# Altium PCB EthereCAT_to_CAN.PcbDoc (part 3 of 3)
Units mil, origin at the board's own origin, x right, y up, seen from the top; angles counter-clockwise.
Board outline 2515.04 x 1574.83 mil, 4 copper layers (Top Layer, L2-G, L3-V, Bottom Layer), stack 23.756 mil thick; 178 components, 102 nets, 583 pads, 389 vias.
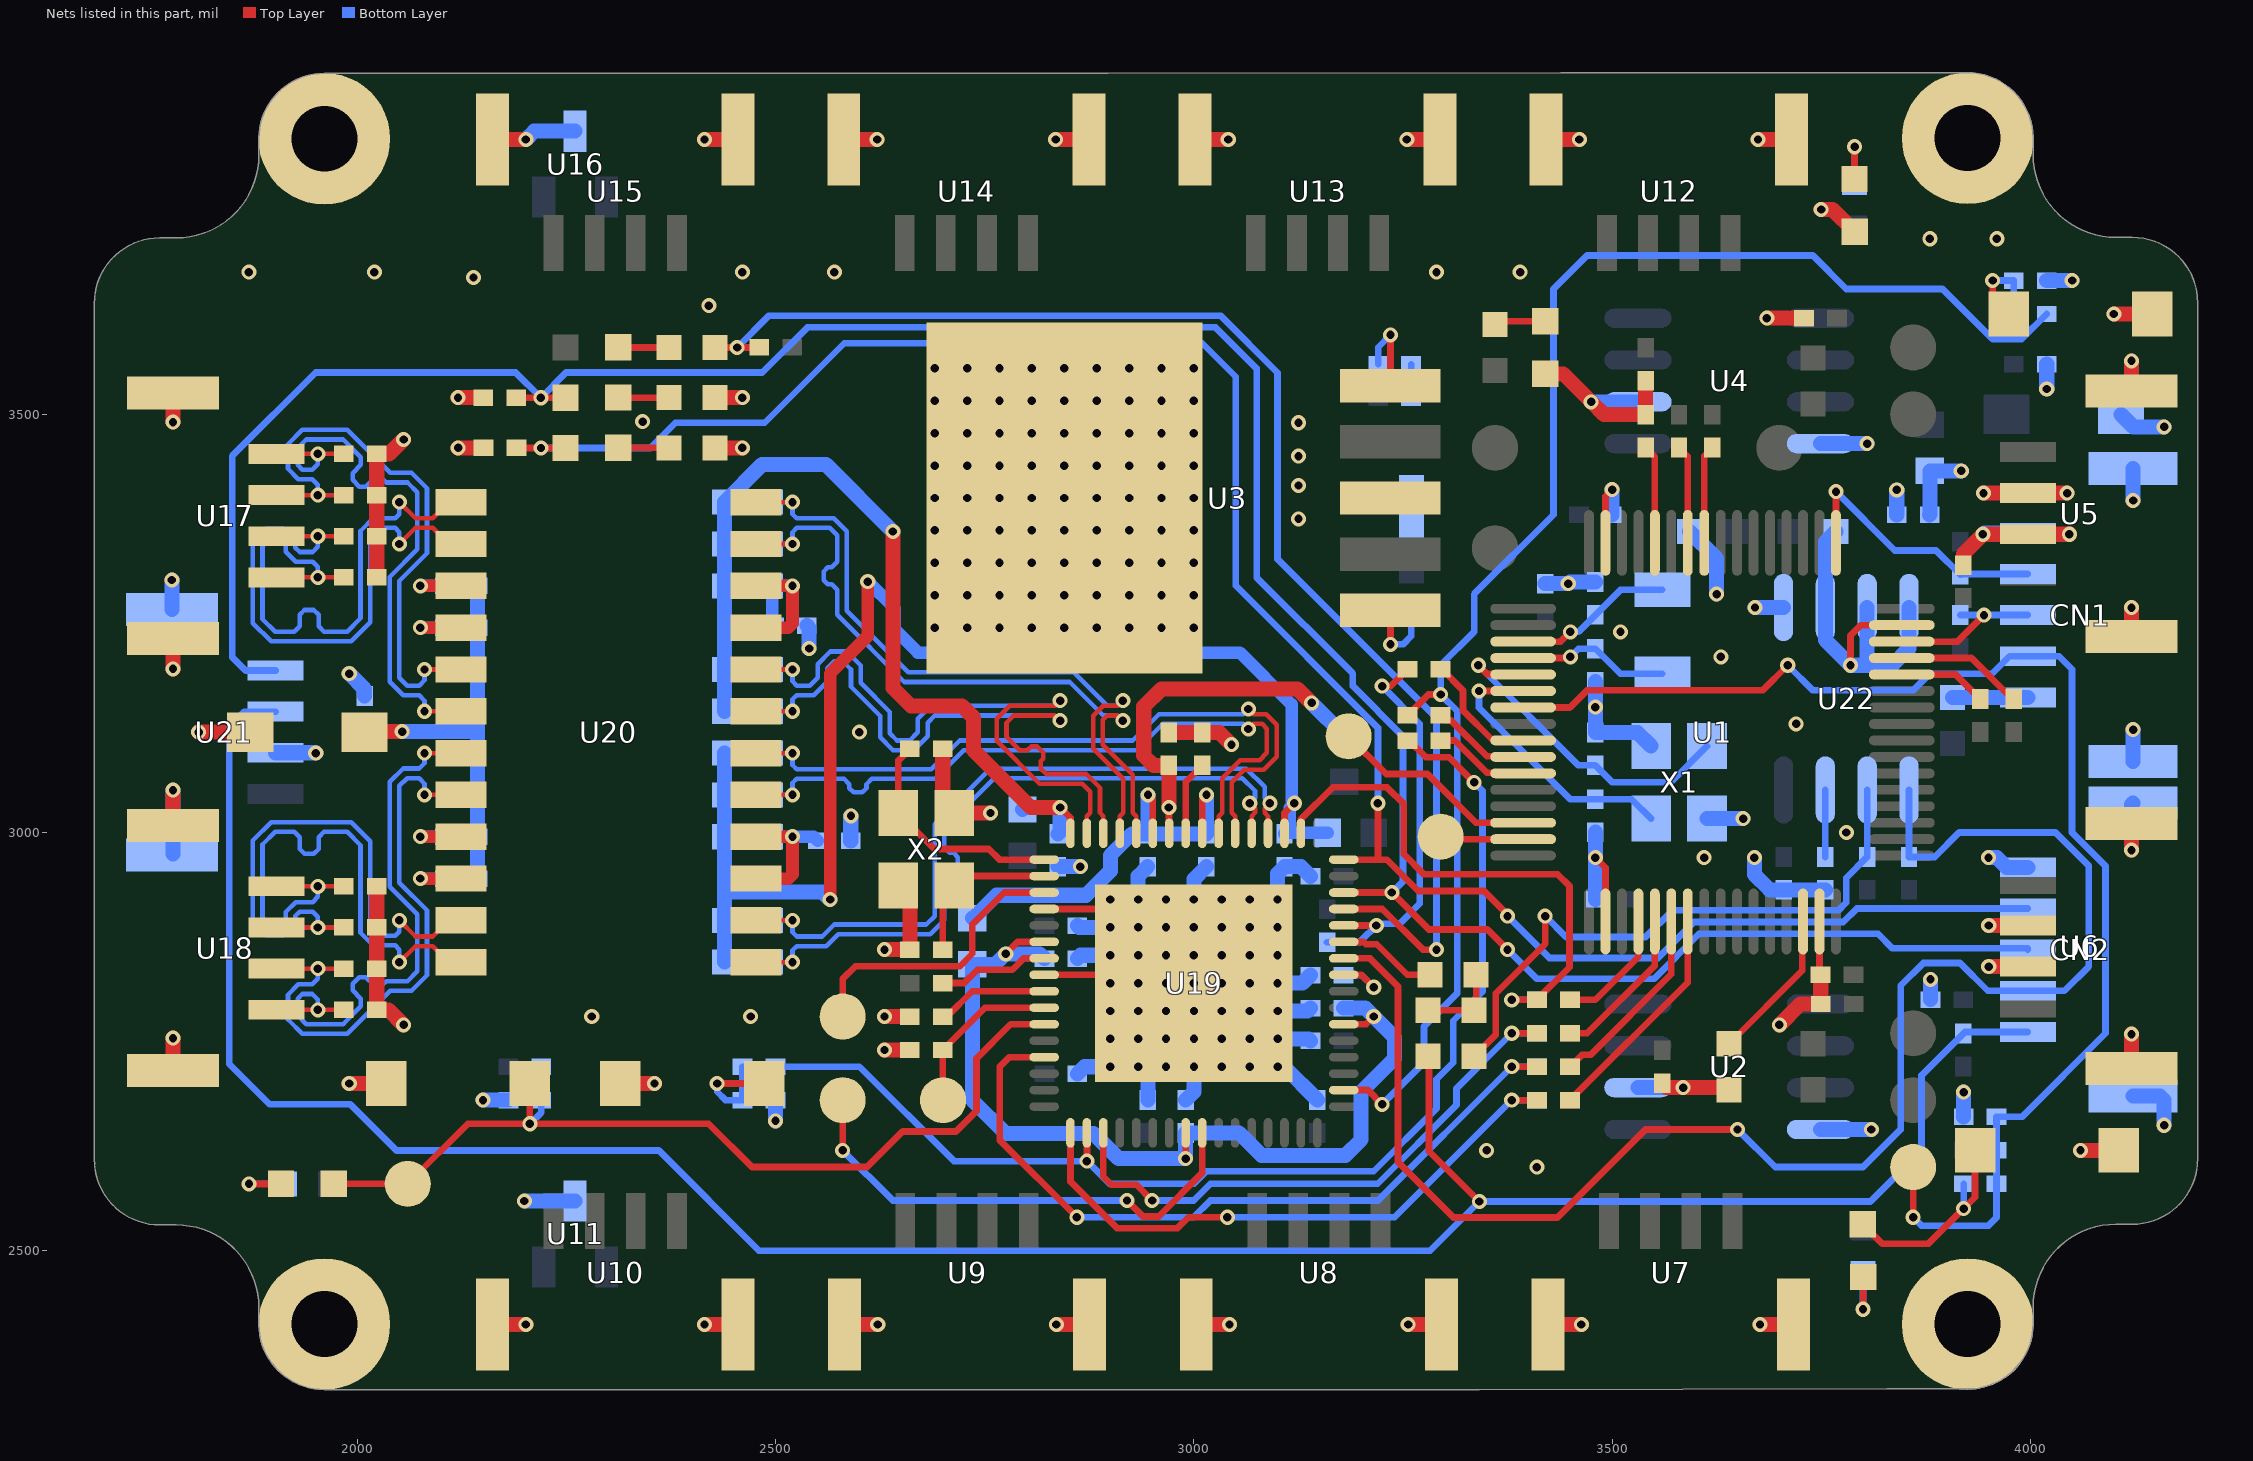
[diagram p4: the nets of this part, all layers, seen from the top]

## Via types
v1: diameter 18, hole 10, Top Layer to Bottom Layer, tented both sides, 389 vias

## Nets (pads, with @x,y where several pads share a name; then routed paths per layer and width w, separated by ;. In a path a pad name is that pad's centre, name@x,y a point inside that pad or via, vN(x,y) a via of type N, cw(c..) or ccw(c..) an arc to the next point about the centre after c; other vN are vias at no path point) (continued)
GND: C1.1 C2.1 C3.1 C4.1 C5.1 C6.1 C7.1 C8.1 C9.1 C10.2 C11.1 C12.1 C13.1 C14.1 C15.1 C16.1 C17.1 C18.1 C19.1 C20.1 C21.1 C24.1 C25.1 C26.1 C27.1 C28.1 C29.1 C30.1 C31.1 C32.1 C33.1 C34.1 C35.1 C36.1 C37.1 C38.1 C39.1 C40.1 C41.1 C42.1 C43.1 C44.1 C45.1 C46.1 C47.1 C48.1 C49.1 C50.1 C51.1 C52.1 C53.1 C54.1 C70.1 CN1.5 CN1.6 CN1.7 CN2.5 CN2.6 CN2.7 D1.1 D2.1 D3.1 D11.1 pad.0 R38.1 R46.1 R47.2 R48.1 R51.2 R52.2 R53.2 R54.2 R61.1 R74.1 SW1.1 SW2.1 SW3.1 SW4.1 U1.18 U1.31 U1.47 U1.63 U2.2 U2.8 U3.3 U3.PAD U4.2 U4.8 U5.2 U5.3 U5.5 U5.6 U6.2 U6.3 U6.5 U6.6 U7.5 U7.6 U8.5 U8.6 U9.5 U9.6 U10.5 U10.6 U11.3 U12.5 U12.6 U13.5 U13.6 U14.5 U14.6 U15.5 U15.6 U16.3 U17.5 U17.6 U18.5 U18.6 U19.4 U19.8 U19.65 U21.2 U21.5 U21.6 U22.1 U22.2 U22.3 U22.4 X1.2 X1.4 X2.2 X2.4 | length 6274
  Top Layer w8: U19.8@2820.87,2829.84 U19.65@2990.14,2829.84 ; U19.4@2820.87,2908.58 2911.4,2908.58 U19.65@2990.14,2829.84 ; v1(3000,2819.98) U19.65@2990.14,2829.84 ; v1(3480,2970) 3492.05,2957.95 U1.18@3492.05,2893.63 ; U1.63@3492.05,3346.37 3492.05,3402.05 v1(3500,3410) ; U1.31@3747.95,2893.63 3747.95,2831.27 C14.1@3749.22,2830 ; v1(3785,3200) 3785,3235.51 3797.44,3247.95 U1.47@3846.37,3247.95
  Top Layer w18: U18.5@1779.22,2715.24 v1(1779.22,2754.22) ; U18.6@1779.22,3008.54 v1(1779.22,3050.78) ; v1(1779.22,3195.78) U17.5@1779.22,3232.24 ; v1(1779.22,3490.78) U17.6@1779.22,3525.54 ; v1(1810,3120) D11.1@1871.69,3120 ; v1(1990,2700) SW4.1@2033.98,2700 ; C31.1@2022.93,2935.71 C29.1@2022.93,2886.5 C30.1@2022.93,2837.29 C32.1@2022.93,2788.07 2036.93,2788.07 v1(2055,2770) ; C36.1@2022.93,3305.07 C35.1@2022.93,3354.29 C34.1@2022.93,3403.5 C33.1@2022.93,3452.71 2037.71,3452.71 v1(2055,3470) ; v1(2120,3520) R53.2@2150.31,3520 ; v1(2120.31,3460) R54.2@2150.63,3460 ; U10.6@2161.41,2411.76 v1(2201.27,2411.76) ; U15.5@2161.41,3828.73 v1(2201.27,3828.73) ; SW3.1@2313.98,2700 v1(2355,2700) ; v1(2414.84,2411.76) U10.5@2454.71,2411.76 ; v1(2414.84,3828.73) U15.6@2454.71,3828.73 ; R52.2@2427.5,3460 v1(2460,3460) ; R51.2@2427.5,3520 v1(2460,3520) ; U14.5@2581.28,3828.73 v1(2621.14,3828.73) ; U9.6@2582.08,2411.76 v1(2621.94,2411.76) ; v1(2630,2740) R48.1@2660.32,2740 ; v1(2630,2780) R38.1@2660.32,2780 ; v1(2630,2860) C49.1@2660.32,2860 2660.32,2922.91 X2.4@2646.53,2936.69 ; C48.1@2699.68,3100 2699.68,3037.09 X2.2@2713.47,3023.31 v1(2756.69,3023.31) ; v1(2834.71,3828.73) U14.6@2874.58,3828.73 ; v1(2835.51,2411.76) U9.5@2875.38,2411.76 ; C40.1@2970,3119.68 R46.1@3010,3119.68 3030.32,3119.68 v1(3045,3105) ; U13.5@3001.14,3828.73 v1(3041.01,3828.73) ; U8.6@3002.74,2411.76 v1(3042.61,2411.76) ; v1(3254.58,3828.73) U13.6@3294.44,3828.73 ; v1(3256.18,2411.76) U8.5@3296.04,2411.76 ; D1.1@3420.14,3548.53 3441.47,3548.53 v1(3475,3515) 3490.32,3499.68 R74.1@3540,3499.68 C8.1@3540,3540.32 ; U12.5@3421.01,3828.73 v1(3460.88,3828.73) ; U7.6@3423.41,2411.76 v1(3463.28,2411.76) ; C3.1@3560,2700.32 3565.31,2695 v1(3585,2695) 3637.5,2695 C18.1@3640,2692.5 ; v1(3674.45,3828.73) U12.6@3714.31,3828.73 ; v1(3676.85,2411.76) U7.5@3716.71,2411.76 ; v1(3685,3615) C9.1@3729.47,3615 ; v1(3700,2770) 3725,2795 C4.1@3749.47,2795 3749.47,2829.75 C14.1@3749.22,2830 ; v1(3750,3745) 3763.66,3745 D3.1@3790.14,3718.53 ; C15.1@3920,3319.68 3920,3333.36 v1(3943.32,3356.68) U5.2@3997.08,3356.68 v1(4046.68,3356.68) ; v1(3944.11,3405.89) U5.3@3997.08,3405.89 v1(4044.11,3405.89) ; v1(3950.32,2839.68) U6.2@3997.08,2839.68 ; v1(3950.32,2888.89) U6.3@3997.08,2888.89 ; v1(4060,2620) SW1.1@4106.02,2620 ; v1(4100,3620) SW2.1@4146.02,3620 ; U6.6@4121.1,2717.64 v1(4121.1,2758.9) ; v1(4121.1,2978.9) U6.5@4121.1,3010.94 ; U5.6@4121.1,3234.64 v1(4121.1,3268.9) ; U5.5@4121.1,3527.94 v1(4121.1,3563.9)
  Bottom Layer w18: U21.5@1777.99,3266.65 v1(1777.99,3302.01) ; U21.6@1779.22,2974.58 v1(1779.22,3050.78) ; U21.2@1902.01,3095.39 1949.61,3095.39 v1(1950,3095) ; v1(1990,3190) 2008.31,3171.69 C70.1@2008.31,3163.31 ; v1(2150,2680) C27.1@2180.32,2680 ; v1(2199.37,2559.37) U11.3@2260,2559.37 ; v1(2201.27,3828.73) 2211.14,3838.59 U16.3@2260.01,3838.59 ; v1(2499.68,2655.32) C26.1@2499.68,2680 ; C37.1@2537.18,3247.5 2540,3244.69 v1(2540,3220) ; C28.1@2589.68,2990 2589.68,3019.68 v1(2590,3020) ; C38.1@2837.37,2959.14 v1(2864.14,2959.14) ; C46.1@2860.56,2711.42 2869.1,2719.97 v1(2900.02,2719.97) ; C50.1@2860.56,2849.22 2864.64,2853.3 v1(2899.99,2853.3) ; C43.1@2860.56,2888.59 2862.51,2886.64 v1(2899.99,2886.64) ; v1(2933.32,2919.97) 2933.32,2947.84 C54.1@2944.62,2959.14 ; v1(2933.35,2719.97) 2945,2708.32 C45.1@2945,2680.24 ; C52.1@2990.17,2680.24 3000.02,2690.08 v1(3000.02,2719.99) ; v1(2999.98,2919.98) 2999.98,2944.27 C53.1@3014.85,2959.14 ; v1(3100.01,2720) 3107.88,2720 C44.1@3147.65,2680.24 ; v1(3100.01,2753.33) 3136.9,2753.33 C42.1@3139.45,2750.79 ; v1(3100.01,2786.67) 3135.95,2786.67 C51.1@3139.45,2790.16 ; v1(3100,2820) 3129.91,2820 R47.2@3139.45,2829.53 ; v1(3099.98,2920) 3099.98,2950.84 C41.1@3108.28,2959.14 3127.95,2959.14 C39.1@3139.45,2947.64 ; C16.1@3420,3297.56 v1(3447.56,3297.56) 3449.68,3299.68 C2.1@3480,3299.68 ; v1(3475,3515) U4.2@3530.85,3515 ; C10.2@3480,3000.31 v1(3480,2970) 3480,2920.32 C17.1@3480.32,2920 ; C1.1@3480,3180.32 v1(3480,3150) C7.1@3480,3119.68 3530.16,3119.68 X1.2@3546.53,3103.31 ; C19.1@3499.68,3380 3500,3380.32 v1(3500,3410) ; U2.2@3530.85,2695 v1(3585,2695) ; C21.1@3592.5,3360 3625,3327.5 v1(3625,3285) ; X1.4@3613.47,3016.69 v1(3656.69,3016.69) ; v1(3670,2970) 3670,2950 3688.52,2931.48 C47.1@3705,2931.48 R61.1@3755,2931.48 ; v1(3670.85,3269.15) U22.1@3705,3269.15 ; U2.8@3749.15,2645 v1(3810,2645) ; U4.8@3749.15,3465 v1(3805,3465) ; C20.1@3767.5,3360 3755,3347.5 U22.2@3755,3269.15 3755,3230 v1(3785,3200) 3810,3200 ; U22.3@3805,3269.15 3805,3205 3810,3200 ; C11.1@3840.32,3380 v1(3840.32,3409.68) ; U22.4@3855,3269.15 3855,3220 3835,3200 3810,3200 ; C13.1@3880.63,2800.31 v1(3880.63,2824.37) ; C24.1@3920.32,2660 v1(3920.32,2689.68) ; v1(3943.32,3356.68) 3945.04,3358.4 CN1.5@3997.01,3358.4 ; v1(3950,2970) 3960,2970 3971.6,2958.4 CN2.5@3997.01,2958.4 ; v1(4019.68,3530.32) C12.1@4019.68,3560 ; C25.1@4019.68,3660 v1(4050,3660) ; D2.1@4108.31,3500 4123.31,3485 v1(4160,3485) ; v1(4121.1,2978.9) 4121.1,3033.3 CN2.7@4122.99,3035.2 ; CN2.6@4122.99,2684.8 4155.2,2684.8 4160,2680 v1(4160,2650) ; CN1.6@4122.99,3084.8 v1(4122.99,3122.99) ; v1(4122.99,3397.01) CN1.7@4122.99,3435.2
  other v1: 3410,2600 3350,2620 2966.68,2719.97 3033.35,2720 3066.68,2720 2900.02,2753.3 2933.35,2753.3 2966.68,2753.3 3000.02,2753.32 3033.35,2753.33 3066.68,2753.33 2280,2780 2470,2780 2900.02,2786.64 2933.35,2786.64 2966.68,2786.64 3000.02,2786.65 3033.35,2786.67 3066.68,2786.67 2900,2819.97 2933.33,2819.97 2966.67,2819.97 3033.33,2820 3066.67,2820 2933.32,2853.3 2966.65,2853.3 2999.98,2853.32 3033.32,2853.33 3066.65,2853.33 3099.98,2853.33 2933.32,2886.64 2966.65,2886.64 2999.98,2886.65 3033.32,2886.67 3066.65,2886.67 3099.98,2886.67 2899.99,2919.97 2966.65,2919.97 3033.32,2920 3066.65,2920 3610,2970 3780,3000 2600,3120 3720,3130 3630,3210 3510,3240 2690.04,3245.02 2728.79,3245.02 2767.53,3245.02 2806.28,3245.02 2845.02,3245.02 2883.76,3245.02 2922.51,3245.02 2961.25,3245.02 3000,3245.02 2690.04,3283.77 2728.79,3283.77 2767.53,3283.77 2806.28,3283.77 2845.02,3283.77 2883.76,3283.77 2922.51,3283.77 2961.25,3283.77 3000,3283.77 2690.04,3322.51 2728.79,3322.51 2767.53,3322.51 2806.28,3322.51 2845.02,3322.51 2883.76,3322.51 2922.51,3322.51 2961.25,3322.51 3000,3322.51 2690.04,3361.26 2728.79,3361.26 2767.53,3361.26 2806.28,3361.26 2845.02,3361.26 2883.76,3361.26 2922.51,3361.26 2961.25,3361.26 3000,3361.26 3125,3375 2690.04,3400 2728.79,3400 2767.53,3400 2806.28,3400 2845.02,3400 2883.76,3400 2922.51,3400 2961.25,3400 3000,3400 3125,3415 2690.04,3438.74 2728.79,3438.74 2767.53,3438.74 2806.28,3438.74 2845.02,3438.74 2883.76,3438.74 2922.51,3438.74 2961.25,3438.74 3000,3438.74 3125,3450 2690.04,3477.49 2728.79,3477.49 2767.53,3477.49 2806.28,3477.49 2845.02,3477.49 2883.76,3477.49 2922.51,3477.49 2961.25,3477.49 3000,3477.49 3125,3490 2340.75,3491.25 2690.04,3516.23 2728.79,3516.23 2767.53,3516.23 2806.28,3516.23 2845.02,3516.23 2883.76,3516.23 2922.51,3516.23 2961.25,3516.23 3000,3516.23 2690.04,3554.98 2728.79,3554.98 2767.53,3554.98 2806.28,3554.98 2845.02,3554.98 2883.76,3554.98 2922.51,3554.98 2961.25,3554.98 3000,3554.98 2420,3630 2138.62,3663.58 1870,3670 2020,3670 2460,3670 2570,3670 3290,3670 3390,3670 3880,3710 3960,3710
LINK0: CN2.4 D8.2 R54.1 U19.48 | length 2497.7
  Top Layer w8: R54.1@2190,3460 2190.14,3459.86 v1(2219.33,3459.86) D8.2@2248.53,3459.86 ; U19.48@3179.13,2967.64 3230.54,2967.64 3268.19,2930 3347.02,2930 3375,2902.02 v1(3375,2900) ; 3220,2967.64 v1(3220,3035)
  Bottom Layer w8: v1(2219.33,3459.86) 2349.86,3459.86 2380,3490 2486.87,3490 2581.87,3585 3010,3585 3050,3545 3050,3295.2 3220,3125.2 v1(3220,3035) ; v1(3375,2900) 3425,2850 3555,2850 3598,2893 3776.43,2893 3792.63,2909.2 CN2.4@3997.01,2909.2
LINK1: CN2.3 D7.2 R53.1 U19.46 U21.4 | length 3288.1
  Top Layer w8: R53.1@2189.68,3520 2189.82,3519.86 v1(2219.17,3519.86) D7.2@2248.52,3519.86 ; U19.46@3179.13,2928.27 v1(3236.73,2928.27) 3280.86,2884.14 3350.86,2884.14 v1(3375,2860)
  Bottom Layer w8: U21.4@1902.01,3193.82 1866.18,3193.82 1850,3210 1850,3450 1950,3550 2189.03,3550 v1(2219.17,3519.86) 2249.3,3550 2483.9,3550 2537.9,3604 3026,3604 3075,3555 3075,3305 3190,3190 3190,3175 3250,3115 3250,2941.55 v1(3236.73,2928.27) ; v1(3375,2860) 3410,2825 3550,2825 3604,2879 3817.87,2879 3835.37,2861.5 3997.01,2861.5 CN2.3@3997.01,2860
NetC18_2: C18.2 U1.30 | length 182.7
  Top Layer w8: C18.2@3640,2747.5 3727.41,2834.91 3727.41,2892.77 U1.30@3728.27,2893.63
NetC25_2: C25.2 R30.2 SW2.2 | length 113.2
  Top Layer w8: v1(3955,3660) 3955,3638.98 SW2.2@3973.98,3620
  Bottom Layer w8: v1(3955,3660) C25.2@3980.31,3660 R30.2@3980.31,3620
NetC26_2: C26.2 R37.2 SW3.2 | length 140.5
  Top Layer w8: v1(2430,2700) SW3.2@2486.02,2700
  Bottom Layer w8: v1(2430,2700) 2430,2690 2440,2680 C26.2@2460.31,2680 R37.2@2460.31,2720
NetC70_2: C70.2 D11.2 R80.1 R90.1 R91.1 R92.1 | length 531.8
  Top Layer w18: D11.2@2008.31,3120 2008.9,3120.59 v1(2053.28,3120.59)
  Bottom Layer w18: C70.2@2008.31,3123.94 2011.65,3120.59 v1(2053.28,3120.59) 2143.5,3120.59 ; R92.1@2143.5,2945 R91.1@2143.5,2995 2143.5,3120.59 ; R90.1@2143.5,3295 R80.1@2143.5,3245 2143.5,3120.59
NetD1_2: D1.2 R2.1 | length 61.5
  Top Layer w8: R2.1@3360,3607.5 3363.98,3611.47 D1.2@3419.86,3611.47
NetD3_2: D3.2 R21.2 | length 70.9
  Top Layer w8: D3.2@3789.86,3781.47 3789.86,3809.86
  Bottom Layer w8: R21.2@3790,3777.5 v1(3790,3820)
NetD4_1: D4.1 R24.2 SW1.2 | length 252.3
  Top Layer w8: D4.1@3799.86,2531.48 3822.85,2508.5 3878.5,2508.5 v1(3920.31,2550.31) 3933.98,2563.98 SW1.2@3933.98,2620
  Bottom Layer w8: v1(3920.31,2550.31) R24.2@3920.31,2580
NetD4_2: D4.2 R22.2 | length 81.1
  Top Layer w8: v1(3800,2430) 3800.14,2430.14 D4.2@3800.14,2468.52
  Bottom Layer w8: v1(3800,2430) R22.2@3800,2472.5
NetD5_2: D5.2 R29.2 | length 80.8
  Top Layer w8: v1(1870.13,2579.86) D5.2@1908.52,2579.86
  Bottom Layer w8: v1(1870.13,2579.86) 1870.27,2580 R29.2@1912.5,2580
NetD6_1: D6.1 R50.1 | length 61.1
  Top Layer w8: D6.1@2311.47,3580.14 2311.61,3580 R50.1@2372.5,3580
NetD7_1: D7.1 R51.1 | length 61.1
  Top Layer w8: D7.1@2311.48,3520.14 2311.61,3520 R51.1@2372.5,3520
NetD8_1: D8.1 R52.1 | length 61.1
  Top Layer w8: D8.1@2311.47,3460.14 2311.61,3460 R52.1@2372.5,3460
NetR3_1: R3.1 U3.1 | length 95
  Top Layer w8: v1(3234.98,3225.02) U3.1@3234.98,3266
  Bottom Layer w8: v1(3234.98,3225.02) 3250.02,3225.02 3259.68,3234.68 R3.1@3259.68,3260
NetR4_2: R4.2 R7.1 | length 40
  Bottom Layer w8: R4.2@3259.69,3520 R7.1@3259.68,3560
NetR7_2: R7.2 U3.5 | length 102
  Top Layer w8: U3.5@3234.98,3534 v1(3234.98,3594.98)
  Bottom Layer w8: R7.2@3220.31,3560 3220.31,3580.31 v1(3234.98,3594.98)
NetR19_2: R19.2 U1.45 | length 153.9
  Top Layer w8: U1.45@3846.37,3208.58 3929.55,3208.58 3978.44,3159.69 R19.2@3980,3159.69
NetR20_2: R20.2 U1.44 | length 105.7
  Top Layer w8: U1.44@3846.37,3188.9 3910.79,3188.9 R20.2@3940,3159.69
NetR38_2: R38.2 U19.9 | length 133.7
  Top Layer w8: R38.2@2699.69,2780 2704.8,2780 2734.96,2810.16 U19.9@2820.87,2810.16
NetR46_2: R46.2 U19.57 | length 89.4
  Top Layer w8: U19.57@2990.17,2999.13 2990.17,3060.48 R46.2@3010,3080.31
NetR47_1: R47.1 U19.41 | length 84.2
  Top Layer w8: U19.41@3179.13,2829.84 3200.16,2829.84 v1(3215,2815)
  Bottom Layer w8: R47.1@3178.82,2829.53 3200.47,2829.53 v1(3215,2815)
NetR48_2: R48.2 TP13.1 U19.10 | length 202.2
  Top Layer w8: TP13.1@2700,2680 2699.69,2680.31 R48.2@2699.69,2740 2750.16,2790.47 U19.10@2820.87,2790.47
NetR56_2: R56.2 R57.1 R60.1 | length 98.5
  Top Layer w8: R56.2@3280,2787.5 R60.1@3335,2787.5 3337.5,2789.99 R57.1@3337.5,2830
NetR57_2: R57.2 U19.43 | length 119.6
  Top Layer w8: U19.43@3179.13,2869.21 3203.04,2869.21 3205.82,2866.44 3218.56,2866.44 3255,2830 R57.2@3282.5,2830
NetR61_2: R61.2 U22.7 | length 80
  Bottom Layer w8: R61.2@3755,2970.85 U22.7@3755,3050.85
NetR70_2: R70.2 U1.58 | length 118.3
  Top Layer w8: R70.2@3580,3460.31 3590.47,3449.84 U1.58@3590.47,3346.37
NetR71_2: R71.2 U1.57 | length 118
  Top Layer w8: U1.57@3610.16,3346.37 3610.16,3450.47 R71.2@3620,3460.31
NetR74_2: R74.2 U1.60 | length 118.5
  Top Layer w8: R74.2@3540,3460.31 3551.1,3449.21 U1.60@3551.1,3346.37
NetR75_1: R75.1 U1.21 | length 187.5
  Top Layer w8: R75.1@3449.68,2760 3470,2760 3551.1,2841.1 U1.21@3551.1,2893.63
NetR76_1: R76.1 U1.22 | length 229.8
  Top Layer w8: R76.1@3449.68,2720 3463.89,2734.2 3474.2,2734.2 3570.79,2830.79 U1.22@3570.79,2893.63
NetR77_1: R77.1 U1.23 | length 271.9
  Top Layer w8: R77.1@3449.68,2680 3590.47,2820.78 U1.23@3590.47,2893.63
NetR78_1: R78.1 U1.20 | length 145.2
  Top Layer w8: R78.1@3449.68,2800 3480,2800 3531.42,2851.42 U1.20@3531.42,2893.63
NetTP12_1: TP12.1 U19.25 | length 592
  Top Layer w8: v1(2580,2620) TP12.1@2580,2680 ; v1(2920,2560) 2939,2541 2957.87,2541 3009.85,2592.98 U19.25@3009.85,2640.86
  Bottom Layer w8: v1(2580,2620) 2640,2560 v1(2920,2560)
NetTP14_1: TP14.1 U19.3 | length 349.2
  Top Layer w8: TP14.1@2580,2780 2580,2825 2595,2840 2720,2840 2735,2855 2735,2890 2773.27,2928.27 U19.3@2820.87,2928.27
PC1: R79.1 U1.9 | length 147.6
  Top Layer w8: R79.1@3295.68,3195.98 3321.79,3169.86 3321.79,3145.72 3356.62,3110.89 3392.9,3110.89 U1.9@3393.63,3110.16
PC2: R72.1 U1.10 | length 119.5
  Top Layer w8: R72.1@3294.68,3140 3300.53,3134.16 3307.51,3134.16 3350.47,3091.2 3392.9,3091.2 U1.10@3393.63,3090.47
PC3: R73.1 U1.11 | length 116.5
  Top Layer w8: R73.1@3293.34,3110 3311.87,3110 3350.35,3071.52 3392.9,3071.52 U1.11@3393.63,3070.79
PHY_IRQn: R39.2 R79.2 U19.44 | length 486.1
  Top Layer w8: U19.44@3179.13,2888.9 v1(3218.05,2888.9) ; v1(3225,3175) 3235.31,3175 R79.2@3255.31,3195
  Bottom Layer w8: R39.2@3159.13,2868.9 3198.05,2868.9 3219.96,2890.82 3245.82,2890.82 3270,2915 3270,3130 v1(3225,3175)
REG_EN: R40.2 U19.7 | length 133.4
  Top Layer w8: R40.2@2699.69,2820 2725,2820 2741,2836 2782.87,2836 2796.4,2849.53 U19.7@2820.87,2849.53
RST2n: C24.2 CN1.2 R23.2 R24.1 TP9.1 U1.7 | length 1624.8
  Top Layer w8: U1.7@3393.63,3149.53 3449.53,3149.53 3470,3170 3680,3170 v1(3710,3200) ; v1(3860,2540) TP9.1@3860,2600
  Bottom Layer w8: v1(3710,3200) 3740,3170 3860,3170 3880,3190 3954.55,3190 3975.35,3210.8 4034.47,3210.8 4050,3195.27 4050,3000 4090,2960 4090,2760 3990,2660 C24.2@3959.69,2660 R24.1@3959.68,2580 3959.68,2539.68 3950,2530 3870,2530 v1(3860,2540)
RSTn: C27.2 D5.1 R36.2 SW4.2 TP11.1 U19.11 | length 1130.4
  Top Layer w8: D5.1@1971.48,2580.14 2059.86,2580.14 TP11.1@2060,2580 2131.81,2651.81 v1(2206.02,2651.81) ; SW4.2@2206.02,2700 v1(2206.02,2651.81) ; U19.11@2820.87,2770.79 2780.79,2770.79 2740,2730 2740,2666.88 2715.56,2642.44 2651.76,2642.44 2609.31,2600 2471.62,2600 2419.8,2651.81 v1(2206.02,2651.81)
  Bottom Layer w8: v1(2206.02,2651.81) 2219.69,2665.48 C27.2@2219.69,2680 R36.2@2219.69,2720
RUN_E2PS: R49.2 R50.2 U19.45 | length 1642.4
  Top Layer w8: R50.2@2427.5,3580 v1(2453.91,3580) R49.2@2480.31,3580 ; U19.45@3179.13,2908.58 3225.24,2908.58 3273.82,2860 v1(3290,2860)
  Bottom Layer w8: v1(2453.91,3580) 2491.91,3618 3031.8,3618 3100,3549.8 3100,3326.87 3290,3136.87 v1(3290,2860)
RXA+: C30.2 U18.3 U20.20 | length 701.3
  Top Layer w5.5: U18.3@1903.24,2837.29 v1(1952.48,2837.29) C30.2@1983.56,2837.29 ; v1(2080,3045) U20.20@2123.82,3045
  Bottom Layer w5.5: v1(1952.48,2837.29) 1952.48,2825.03 1945.87,2818.43 1929.24,2818.43 1916.79,2805.98 1916.79,2776.45 1933.96,2759.28 1987.41,2759.28 2038.91,2810.78 2064.48,2810.78 2083,2829.3 2083,2907.02 2050,2940.02 2050,3055.79 2059.24,3065.03 2073.52,3065.03 2080,3058.55 v1@2080,3045.78
RXA-: C32.2 U18.4 U20.19 | length 701.3
  Top Layer w5.5: U18.4@1903.24,2788.07 v1(1952.48,2788.07) C32.2@1983.56,2788.07 ; v1(2080,3095) U20.19@2123.82,3095
  Bottom Layer w5.5: v1(1952.48,2788.07) 1952.48,2800.32 1945.87,2806.93 1934.01,2806.93 1928.29,2801.21 1928.29,2781.21 1938.72,2770.78 1982.65,2770.78 1986.16,2774.29 2004.01,2792.15 2004.01,2801.26 1994.07,2811.2 1994.07,2819.15 2002.03,2827.11 2009.98,2827.11 2019.92,2817.17 2029.04,2817.17 2034.15,2822.28 2035.78,2822.28 2059.71,2822.28 2071.5,2834.07 2071.5,2902.26 2038.5,2935.26 2038.5,3060.56 2054.48,3076.53 2073.52,3076.53 2080,3083.01 v1(2080,3095) v1@2080,3095.78
RXA_N: R35.2 U19.54 U20.6 | length 868.2
  Top Layer w5.5: U20.6@2476.18,3095 v1(2520,3095) ; U19.54@3049.22,2999.13 3049.22,3019.6 3045.13,3023.69 3045.13,3060.13 3060,3075 3083.39,3075 3098.81,3090.41 3098.81,3129.08 3086.38,3141.5 3071.25,3141.5 v1(3065,3147.75)
  Bottom Layer w5.5: R35.2@2495.87,3095 v1(2520,3095) 2520,3080.75 2525,3075.75 2685.75,3075.75 2720,3110 2926.76,3110 2958.26,3141.5 3058.75,3141.5 v1(3065,3147.75)
RXA_P: R34.2 U19.55 U20.5 | length 868.2
  Top Layer w5.5: U20.5@2476.18,3045 v1(2520,3045) ; U19.55@3029.54,2999.13 3029.54,3019.6 3033.63,3023.69 3033.63,3064.89 3055.24,3086.5 3078.63,3086.5 3087.31,3095.18 3087.31,3124.31 3081.62,3130 3071.25,3130 v1(3065,3123.75)
  Bottom Layer w5.5: R34.2@2495.87,3045 v1(2520,3045) 2520,3059.25 2525,3064.25 2558.33,3064.25 2581.58,3064.25 2588.02,3057.81 2588.02,3053.07 2593.14,3047.95 2603.39,3047.95 2608.52,3053.07 2608.52,3057.81 2614.96,3064.25 2630,3064.25 2690.51,3064.25 2724.76,3098.5 2931.52,3098.5 2963.02,3130 3058.75,3130 v1(3065,3123.75)
RXB+: C35.2 U17.3 U20.14 | length 701.1
  Top Layer w5.5: U17.3@1903.24,3354.29 v1(1952.48,3354.29) C35.2@1983.56,3354.29 ; v1(2050,3345) 2069.25,3364.25 2089.8,3364.25 2109.05,3345 U20.14@2123.82,3345
  Bottom Layer w5.5: v1(1952.48,3354.29) 1952.48,3341.68 1946.23,3335.43 1930.75,3335.43 1925.65,3340.54 1925.65,3348.8 1911.08,3363.36 1890.86,3363.36 1874.75,3347.25 1874.75,3250.31 1896.56,3228.5 1992.24,3228.5 2015,3251.26 2015,3355.78 2023.47,3364.25 2045,3364.25 2050,3359.25 v1(2050,3345)
RXB-: C36.2 U17.4 U20.13 | length 701.1
  Top Layer w5.5: U17.4@1903.24,3305.07 v1(1952.48,3305.07) C36.2@1983.56,3305.07 ; v1(2050,3395) 2069.25,3375.75 2089.8,3375.75 2109.05,3395 U20.13@2123.82,3395
  Bottom Layer w5.5: v1(1952.48,3305.07) 1952.48,3317.69 1946.23,3323.93 1925.99,3323.93 1914.15,3335.77 1914.15,3344.03 1906.32,3351.86 1895.63,3351.86 1886.25,3342.49 1886.25,3255.07 1901.33,3240 1906.96,3240 1924.44,3240 1930.89,3246.44 1930.89,3260.5 1936.51,3266.12 1947.76,3266.12 1953.39,3260.5 1953.39,3246.44 1959.83,3240 1985.08,3240 1987.48,3240 2003.5,3256.02 2003.5,3360.55 2018.7,3375.75 2045,3375.75 2050,3380.75 v1(2050,3395)
RXB_N: R45.2 U19.61 U20.12 | length 830.5
  Top Layer w5.5: U20.12@2476.18,3395 v1(2520,3395) ; U19.61@2911.43,2999.13 2911.43,3019.6 2915.52,3023.69 2915.52,3064.48 2879.67,3100.33 2879.67,3139.67 2891.5,3151.5 2908.75,3151.5 v1(2915,3157.75)
  Bottom Layer w5.5: R45.2@2495.87,3395 v1(2520,3395) 2520,3380.75 2525,3375.75 2569.53,3375.75 2585,3360.28 2585,3265 2658.5,3191.5 2856.12,3191.5 2896.12,3151.5 2908.75,3151.5 v1(2915,3157.75)
RXB_P: R44.2 U19.60 U20.11 | length 830.5
  Top Layer w5.5: U20.11@2476.18,3345 v1(2520,3345) ; v1(2915,3133.75) 2908.75,3140 2896.26,3140 2891.17,3134.91 2891.17,3105.09 2927.02,3069.24 2927.02,3023.69 2931.11,3019.6 U19.60@2931.11,2999.13
  Bottom Layer w5.5: R44.2@2495.87,3345 v1(2520,3345) 2520,3359.25 2525,3364.25 2564.77,3364.25 2573.5,3355.52 2573.5,3346.88 2573.5,3323.63 2567.06,3317.19 2562.32,3317.19 2557.2,3312.06 2557.2,3301.81 2562.32,3296.69 2567.06,3296.69 2573.5,3290.24 2573.5,3275.38 2573.5,3260.24 2653.74,3180 2851.36,3180 2891.36,3140 2908.75,3140 v1(2915,3133.75)
SCL: R58.1 R60.2 U22.6 | length 735
  Top Layer w8: R60.2@3335,2732.5 3361,2758.49 3361,2807.87 3420,2866.87 v1(3420,2900)
  Bottom Layer w8: v1(3420,2900) 3445,2875 3540,2875 3572,2907 3770.63,2907 3780,2916.37 3780,2945.85 R58.1@3805,2970.85 U22.6@3805,3050.85
SDA: CN2.2 R59.1 U19.42 U22.5 | length 1875.8
  Top Layer w8: U19.42@3179.13,2849.53 3210.47,2849.53 3244,2816 3244,2606 3310.21,2539.79 3434.79,2539.79 3540,2645 v1(3650,2645)
  Bottom Layer w8: v1(3650,2645) 3695,2600 3800,2600 3845,2645 3845,2816.87 3872.13,2844 3916,2844 3949.2,2810.8 CN2.2@3997.01,2810.8 4040.8,2810.8 4070,2840 4070,2960.2 4030.2,3000 3915,3000 3885.85,2970.85 R59.1@3855,2970.85 U22.5@3855,3050.85
SPI_CLK: R17.2 R75.2 U19.19 | length 707.6
  Top Layer w8: U19.19@2891.74,2640.86 2891.74,2588.37 2901.11,2579 2931,2579 v1(2950,2560) ; v1(3380,2760) R75.2@3410.31,2760
  Bottom Layer w8: v1(2950,2560) 2999.8,2560 3019.8,2580 3219.8,2580 3314,2674.2 3314,2694 v1(3380,2760) R17.2@3410.31,2760
SPI_CSn: R16.2 R78.2 U19.50 | length 650.4
  Top Layer w8: U19.50@3127.96,2999.13 3127.96,3016.09 3165.92,3054.05 3230.95,3054.05 3250.95,3034.05 3250.95,2974.05 3275,2950 3435,2950 3449,2936 3449,2839 3410.31,2800.31 R78.2@3410.31,2800 v1(3380,2800)
  Bottom Layer w8: v1(3380,2800) R16.2@3410.31,2800
SPI_SI: R15.2 R77.2 U19.17 | length 732.9
  Top Layer w8: U19.17@2852.37,2640.86 2852.37,2582.63 2908,2527 2980.31,2527 2993.31,2540 v1(3040,2540) ; v1(3380,2680) R77.2@3410.31,2680
  Bottom Layer w8: v1(3040,2540) 3240,2540 v1(3380,2680) R15.2@3410.31,2680
SPI_SO: R14.2 R76.2 U19.13 | length 931
  Top Layer w8: U19.13@2820.87,2731.42 2779.56,2731.42 2767.74,2719.6 2767.74,2632.26 v1(2860,2540) ; v1(3380,2720) R76.2@3410.31,2720
  Bottom Layer w8: v1(2860,2540) 2999.6,2540 3019.6,2560 3220,2560 v1(3380,2720) R14.2@3410.31,2720
SWDCLK: CN1.4 R28.2 U1.49 | length 332.2
  Top Layer w8: U1.49@3767.64,3346.37 v1(3767.64,3407.64)
  Bottom Layer w8: v1(3767.64,3407.64) 3837.94,3337.34 3887.34,3337.34 R28.2@3916.49,3308.19 3917.5,3309.2 CN1.4@3997.01,3309.2
SWDIO: CN1.3 R26.2 U1.46 | length 192
  Top Layer w8: U1.46@3846.37,3228.27 3912.99,3228.27 v1(3944.72,3260)
  Bottom Layer w8: R26.2@3916.49,3260 v1(3944.72,3260) CN1.3@3997.01,3260
SYNC0: R30.1 R72.2 U19.34 | length 1839.6
  Top Layer w8: U19.34@3179.13,2692.05 3207.95,2692.05 v1(3225,2675) ; R72.2@3255.31,3140 3280.31,3165 v1(3295,3165)
  Bottom Layer w8: v1(3225,2675) 3275,2725 3275,2768.13 3315,2808.13 3315,3145 v1(3295,3165) 3295,3200 3335,3240 3335,3285 3430,3380 3430,3650 3470,3690 3740,3690 3780,3650 3895,3650 3955,3590 3989.68,3590 R30.1@4019.68,3620
SYNC1: R37.1 R73.2 U19.18 | length 1434.7
  Top Layer w8: v1(2872.06,2607.06) U19.18@2872.06,2640.86 ; R73.2@3257.28,3110 3277.28,3090 3305,3090 v1(3335,3060)
  Bottom Layer w8: R37.1@2499.68,2720 2600,2720 2712.94,2607.06 v1(2872.06,2607.06) 2899.12,2580 3000,2580 3015.05,2595.05 3215.05,2595.05 3290,2670 3290,2705 3310,2725 3310,2775 3345,2810 3345,3050 v1(3335,3060)
TCK: CN2.1 R55.2 R56.1 U21.3 | length 3069.1
  Top Layer w8: R56.1@3280,2732.5 3281.05,2731.45 3281.05,2618.95 v1(3341.21,2558.79)
  Bottom Layer w8: U21.3@1902.01,3144.6 1864.6,3144.6 1846.41,3126.41 1846.41,2723.59 1895,2675 1991.38,2675 2046.55,2619.83 2360.17,2619.83 2480,2500 3282.41,2500 v1(3341.21,2558.79) 3808.79,2558.79 3870,2620 3870,2709.69 R55.2@3920,2759.69 3921.91,2761.6 CN2.1@3997.01,2761.6
TRXACT: C28.2 R31.2 U20.3 U20.4 | length 191.2
  Top Layer w15: U20.3@2476.18,2945 2515,2945 2520,2950 v1(2520,2995) U20.4@2476.18,2995
  Bottom Layer w15: R31.2@2495.87,2995 v1(2520,2995) 2545.32,2995 C28.2@2550.31,2990
TRXBCT: C37.2 R41.2 U20.9 U20.10 | length 208.8
  Top Layer w15: U20.9@2476.18,3245 2515,3245 2520,3250 v1(2520,3295) U20.10@2476.18,3295
  Bottom Layer w15: C37.2@2495.87,3245 2495.87,3295 v1(2520,3295)
TXA+: C31.2 U18.1 U20.24 | length 701.1
  Top Layer w5.5: U18.1@1903.24,2935.71 v1(1952.48,2935.71) C31.2@1983.56,2935.71 ; v1(2050,2845) 2069.25,2864.25 2089.8,2864.25 2109.05,2845 U20.24@2123.82,2845
  Bottom Layer w5.5: v1(1952.48,2935.71) 1952.48,2923.1 1946.23,2916.85 1925.99,2916.85 1914.15,2905.01 1914.15,2896.75 1906.32,2888.92 1895.63,2888.92 1886.25,2898.29 1886.25,2985.71 1901.33,3000.78 1906.96,3000.78 1924.44,3000.78 1930.89,2994.34 1930.89,2980.28 1936.51,2974.66 1947.76,2974.66 1953.39,2980.28 1953.39,2994.34 1959.83,3000.78 1985.08,3000.78 1987.48,3000.78 2003.5,2984.76 2003.5,2880.24 2018.7,2865.03 2045,2865.03 2050,2860.03 v1@2050,2845.78
TXA-: C29.2 U18.2 U20.23 | length 701.1
  Top Layer w5.5: U18.2@1903.24,2886.5 v1(1952.48,2886.5) C29.2@1983.56,2886.5 ; v1(2050,2895) 2069.25,2875.75 2089.8,2875.75 2109.05,2895 U20.23@2123.82,2895
  Bottom Layer w5.5: v1(1952.48,2886.5) 1952.48,2899.11 1946.23,2905.35 1930.75,2905.35 1925.65,2900.24 1925.65,2891.98 1911.08,2877.42 1890.86,2877.42 1874.75,2893.53 1874.75,2990.47 1896.56,3012.28 1992.24,3012.28 2015,2989.52 2015,2885 2023.47,2876.53 2045,2876.53 2050,2881.53 v1(2050,2895) v1@2050,2895.78
TXA_N: R33.2 U19.52 U20.2 | length 867.9
  Top Layer w5.5: U20.2@2476.18,2895 v1(2520,2895) ; U19.52@3088.59,2999.13 3088.59,3019.6 3084.5,3023.69 3084.5,3028.75 v1(3090.75,3035)
  Bottom Layer w5.5: R33.2@2495.87,2895 v1(2520,2895) 2520,2880.75 2525,2875.75 2555.75,2875.75 2570,2890 2680,2890 2690,2900 2690,3010 2756.5,3076.5 3062.76,3076.5 3084.5,3054.76 3084.5,3041.25 v1(3090.75,3035)
TXA_P: R32.2 U19.53 U20.1 | length 867.9
  Top Layer w5.5: U20.1@2476.18,2845 v1(2520,2845) ; v1(3066.75,3035) 3073,3028.75 3073,3023.69 3068.91,3019.6 U19.53@3068.91,2999.13
  Bottom Layer w5.5: R32.2@2495.87,2845 v1(2520,2845) 2520,2859.25 2525,2864.25 2560.51,2864.25 2574.76,2878.5 2684.76,2878.5 2701.5,2895.24 2701.5,2925.47 2701.5,2948.72 2707.94,2955.17 2712.68,2955.17 2717.8,2960.29 2717.8,2970.54 2712.68,2975.67 2707.94,2975.67 2701.5,2982.11 2701.5,2990 2701.5,3005.24 2761.26,3065 3058,3065 3073,3050 3073,3041.25 v1(3066.75,3035)
TXB+: C33.2 U17.1 U20.18 | length 701.3
  Top Layer w5.5: U17.1@1903.24,3452.71 v1(1952.48,3452.71) C33.2@1983.56,3452.71 ; v1(2080,3145) U20.18@2123.82,3145
  Bottom Layer w5.5: v1(1952.48,3452.71) 1952.48,3440.46 1945.87,3433.86 1934.01,3433.86 1928.29,3439.57 1928.29,3459.57 1938.72,3470 1982.65,3470 1986.16,3466.49 2004.01,3448.64 2004.01,3439.52 1994.07,3429.59 1994.07,3421.63 2002.03,3413.68 2009.98,3413.68 2019.92,3423.61 2029.04,3423.61 2034.15,3418.5 2035.78,3418.5 2059.71,3418.5 2071.5,3406.71 2071.5,3338.53 2038.5,3305.53 2038.5,3180.23 2054.48,3164.25 2073.52,3164.25 2080,3157.77 v1(2080,3145)
TXB-: C34.2 U17.2 U20.17 | length 701.3
  Top Layer w5.5: U17.2@1903.24,3403.5 v1(1952.48,3403.5) C34.2@1983.56,3403.5 ; v1(2080,3195) U20.17@2123.82,3195
  Bottom Layer w5.5: v1(1952.48,3403.5) 1952.48,3415.75 1945.87,3422.36 1929.24,3422.36 1916.79,3434.81 1916.79,3464.33 1933.96,3481.5 1987.41,3481.5 2038.91,3430 2064.48,3430 2083,3411.48 2083,3333.76 2050,3300.76 2050,3184.99 2059.24,3175.75 2073.52,3175.75 2080,3182.23 v1(2080,3195)
TXB_N: R43.2 U19.63 U20.8 | length 830.7
  Top Layer w5.5: U20.8@2476.18,3195 v1(2520,3195) ; v1(2840,3157.75) 2833.75,3151.5 2779.79,3151.5 2764.34,3136.05 2764.34,3109.55 2815.38,3058.5 2866.5,3058.5 2876.15,3048.85 2876.15,3023.69 2872.06,3019.6 U19.63@2872.06,2999.13
  Bottom Layer w5.5: R43.2@2495.87,3195 v1(2520,3195) 2520,3180.75 2525,3175.75 2540.75,3175.75 2550,3185 2550,3201.26 2565.24,3216.5 2584.76,3216.5 2601.5,3199.76 2601.5,3179.14 2636.5,3144.14 2636.5,3118.5 2645,3110 2660,3110 2670,3120 2670,3136.26 2685.24,3151.5 2833.75,3151.5 v1(2840,3157.75)
TXB_P: R42.2 U19.62 U20.7 | length 830.7
  Top Layer w5.5: U20.7@2476.18,3145 v1(2520,3145) ; v1(2840,3133.75) 2833.75,3140 2784.55,3140 2775.84,3131.29 2775.84,3114.31 2784.65,3105.5 2791.75,3098.4 2800.86,3098.4 2805.38,3102.92 2812.62,3102.92 2819.87,3095.67 2819.87,3088.42 2817.01,3085.56 2817.01,3076.44 2823.45,3070 2834.33,3070 2871.26,3070 2887.65,3053.61 2887.65,3023.69 2891.74,3019.6 U19.62@2891.74,2999.13
  Bottom Layer w5.5: R42.2@2495.87,3145 v1(2520,3145) 2520,3159.25 2525,3164.25 2545.51,3164.25 2561.5,3180.24 2561.5,3196.5 2570,3205 2580,3205 2590,3195 2590,3174.37 2625,3139.37 2625,3113.74 2640.24,3098.5 2664.76,3098.5 2681.5,3115.24 2681.5,3131.5 2690,3140 2833.75,3140 v1(2840,3133.75)
TXCT1: R92.2 U20.22 | length 78
  Top Layer w15: v1(2075,2945) U20.22@2123.82,2945
  Bottom Layer w15: v1(2075,2945) R92.2@2104.13,2945
TXCT2: R91.2 U20.21 | length 78
  Top Layer w15: v1(2075,2995) U20.21@2123.82,2995
  Bottom Layer w15: v1(2075,2995) R91.2@2104.13,2995
TXCT3: R80.2 U20.16 | length 78
  Top Layer w15: v1(2075,3245) U20.16@2123.82,3245
  Bottom Layer w15: v1(2075,3245) R80.2@2104.13,3245
TXCT4: R90.2 U20.15 | length 78
  Top Layer w15: v1(2075,3295) U20.15@2123.82,3295
  Bottom Layer w15: v1(2075,3295) R90.2@2104.13,3295
UART4_RX: TP7.1 U1.15 | length 99.9
  Top Layer w8: TP7.1@3295,2995 3297.95,2992.05 U1.15@3393.63,2992.05
UART4_TX: TP8.1 U1.14 | length 251.4
  Top Layer w8: TP8.1@3185,3115 3230,3070 3279.09,3070 3337.36,3011.73 U1.14@3393.63,3011.73
VBUS: C11.2 L1.1 | length 90
  Bottom Layer w18: C11.2@3879.69,3380 3880,3380.31 L1.1@3880,3432.45 v1(3917.45,3432.45)
VDD12F: C53.2 C54.2 L7.2 U19.56 U19.59 | length 522.2
  Top Layer w8: v1(2945,3045) 2950.8,3039.2 U19.59@2950.8,2999.13 ; U19.56@3009.85,2999.13 3009.85,3039.85 v1(3015,3045)
  Bottom Layer w18: L7.2@2735,2897.55 2736.26,2897.55 2763.7,2925 2871.07,2925 2900,2953.93 2900,2972.73 2925.77,2998.51 C54.2@2944.62,2998.51 ; v1(2945,3045) 2945,2998.89 C54.2@2944.62,2998.51 ; v1(3015,3045) 3014.85,3044.85 C53.2@3014.85,2998.51 C54.2@2944.62,2998.51
VDD33B: C40.2 L4.2 U19.58 | length 446.9
  Top Layer w8: v1(2970,3030) 2970.24,3029.76 2970.24,2999.37 U19.58@2970.48,2999.13
  Top Layer w18: v1(2970,3030) C40.2@2970,3080.31 2951.56,3080.31 2940,3091.87 2940,3150.66 2961.09,3171.75 3124,3171.75 v1(3140.75,3155)
  Bottom Layer w18: v1(3140.75,3155) L4.2@3180,3115.75
VDD33TXF1: C41.2 L5.2 R31.1 R32.1 R33.1 R34.1 R35.1 U19.51 | length 1612.8
  Top Layer w8: U19.51@3108.28,2999.13 3108.28,3023.28 v1(3120,3035)
  Top Layer w15: v1(2565,2920) 2565,3190 2610,3235 v1(2610,3300)
  Bottom Layer w15: v1(2610,3300) 2642.39,3267.61 2642.39,3242.61 2670,3215 3055,3215 3116.75,3153.25 3116.75,3038.25 v1(3120,3035) 3114.75,3029.75 3114.75,3004.97 C41.2@3109.78,3000 ; C41.2@3108.28,2998.51 C41.2@3109.78,3000 ; L5.2@3160,3000 C41.2@3109.78,3000
  Bottom Layer w18: R32.1@2438.68,2845 R33.1@2438.68,2895 2438.68,2929.08 ; R35.1@2438.68,3095 R34.1@2438.68,3045 R31.1@2438.68,2995 2438.68,2929.08 ; v1(2565,2920) 2555.92,2929.08 2438.68,2929.08
VDD33TXF2: C38.2 L6.2 R41.1 R42.1 R43.1 R44.1 R45.1 U19.64 | length 1086.8
  Top Layer w8: v1(2840,3030) 2852.37,3017.63 U19.64@2852.37,2999.13
  Top Layer w18: v1(2640,3360) 2640,3173 2661.5,3151.5 2722.6,3151.5 2736.5,3137.6 2736.5,3098.5 2805,3030 v1(2840,3030)
  Bottom Layer w18: R42.1@2438.68,3145 R43.1@2438.68,3195 R41.1@2438.68,3295 R44.1@2438.68,3345 R45.1@2438.68,3395 2483.69,3440 2560,3440 v1(2640,3360) ; L6.2@2795,3027.55 2797.45,3030 v1(2840,3030) 2840,3001.13 C38.2@2837.37,2998.51
VDDCR: C50.2 C51.2 C52.2 L7.1 U19.6 U19.24 U19.38 | length 1136.4
  Top Layer w8: v1(2775,2855) 2789.21,2869.21 U19.6@2820.87,2869.21 ; v1(2990.17,2610.17) U19.24@2990.17,2640.86 ; U19.38@3179.13,2770.79 3205.79,2770.79 v1(3215,2780)
  Bottom Layer w18: C50.2@2821.18,2849.22 2815.41,2855 v1(2775,2855) 2762.45,2842.45 L7.1@2735,2842.45 2735,2680 2775,2640 2880,2640 2909.83,2610.17 v1(2990.17,2610.17) C52.2@2990.17,2640.86 3054.14,2640.86 3080.95,2614.05 3181.27,2614.05 3200,2632.79 3200,2690 3240,2730 3240,2755 v1(3215,2780) 3204.84,2790.16 C51.2@3178.82,2790.16
VTREF: CN1.1 R25.1 | length 90
  Bottom Layer w18: R25.1@3907.01,3161.6 CN1.1@3997.01,3161.6
XIN32: C2.2 U1.3 Y1.2 | length 192
  Top Layer w8: U1.3@3393.63,3228.27 3438.27,3228.27 v1(3450,3240)
  Bottom Layer w8: v1(3450,3240) 3459.68,3240 C2.2@3480,3260.31 3509.88,3290.2 Y1.2@3560,3290.2
XOUT32: C1.2 U1.4 Y1.1 | length 183.3
  Top Layer w8: U1.4@3393.63,3208.58 3448.58,3208.58 v1(3450,3210)
  Bottom Layer w8: v1(3450,3210) 3459.69,3219.69 C1.2@3480,3219.69 3509.88,3189.8 Y1.1@3560,3189.8
XTAL2I: C7.2 U1.5 X1.3 | length 407.6
  Top Layer w8: v1(3340,3200) 3350.37,3189.63 3392.9,3189.63 U1.5@3393.63,3188.9
  Bottom Layer w8: v1(3340,3200) 3459.69,3080.31 C7.2@3480,3080.31 3500.31,3060 3570.16,3060 X1.3@3613.47,3103.31
XTAL2O: C10.1 U1.6 X1.1 | length 333.5
  Top Layer w8: v1(3340.79,3169.21) U1.6@3393.63,3169.21
  Bottom Layer w8: v1(3340.79,3169.21) 3340.79,3149.21 3450.32,3039.68 C10.1@3480,3039.68 3523.54,3039.68 X1.1@3546.53,3016.69
XTI: C48.2 U19.1 X2.3 | length 279.8
  Top Layer w8: C48.2@2660.31,3100 2646.53,3086.22 X2.3@2646.53,3023.31 2689.53,2980.31 2754.69,2980.31 2767.36,2967.64 U19.1@2820.87,2967.64
XTO: C49.2 U19.2 X2.1 | length 194.5
  Top Layer w8: C49.2@2699.69,2860 2699.69,2922.91 X2.1@2713.47,2936.69 2724.73,2947.95 U19.2@2820.87,2947.95
pads on no net: U1.2 U1.8 U1.12 U1.13 U1.16 U1.17 U1.24 U1.25 U1.26 U1.27 U1.28 U1.29 U1.33 U1.34 U1.35 U1.36 U1.37 U1.38 U1.39 U1.40 U1.41 U1.42 U1.43 U1.50 U1.51 U1.52 U1.53 U1.54 U1.55 U1.56 U1.59 U1.61 U1.62 U19.12 U19.15 U19.16 U19.21 U19.22 U19.23 U19.26 U19.27 U19.28 U19.29 U19.30 U19.31 U19.33 U19.35 U19.36 U19.39 U19.40 U19.49

## Polygon pours and split planes (outlines as drawn)
GND on Bottom Layer "1" (solid, remove dead copper, pour order 1): 1882.02,2412.23 1882.02,2431.92 ccw(c1783.09,2431.92) 1783.09,2530.84 1763.41,2530.84 cw(c1763.41,2609.08) 1685.17,2609.08 1685.17,3632.7 cw(c1763.41,3632.7) 1763.41,3710.94 1783.09,3710.94 ccw(c1783.09,3809.87) 1882.02,3809.87 1882.02,3829.55 cw(c1960.26,3829.55) 1960.26,3907.79 2897.27,3907.79 3438.51,3908.53 3925.12,3908.53 cw(c3925.12,3830.29) 4003.36,3830.29 4003.36,3810.6 ccw(c4102.29,3810.6) 4102.29,3711.68 4121.97,3711.68 cw(c4121.97,3633.44) 4200.21,3633.44 4200.21,2609.82 cw(c4121.97,2609.82) 4121.97,2531.57 4102.29,2531.58 ccw(c4102.29,2432.65) 4003.36,2432.65 4003.36,2412.96 cw(c3925.12,2412.96) 3925.12,2334.72 3828.25,2334.72 3828.27,2334.72 3340.71,2333.7 3340.72,2333.71 2897.72,2333.71 ccw(c2897.27,2333.49) 2897.27,2333.99 1960.26,2333.99 cw(c1960.26,2412.23)
GND on Top Layer "1" (solid, remove dead copper, pour order 0): 1882.02,2412.23 1882.02,2431.92 ccw(c1783.09,2431.92) 1783.09,2530.84 1763.41,2530.84 cw(c1763.41,2609.08) 1685.17,2609.08 1685.17,3632.7 cw(c1763.41,3632.7) 1763.41,3710.94 1783.09,3710.94 ccw(c1783.09,3809.87) 1882.02,3809.87 1882.02,3829.55 cw(c1960.26,3829.55) 1960.26,3907.79 2897.27,3907.79 3438.51,3908.53 3925.12,3908.53 cw(c3925.12,3830.29) 4003.36,3830.29 4003.36,3810.6 ccw(c4102.29,3810.6) 4102.29,3711.68 4121.97,3711.68 cw(c4121.97,3633.44) 4200.21,3633.44 4200.21,2609.82 cw(c4121.97,2609.82) 4121.97,2531.57 4102.29,2531.58 ccw(c4102.29,2432.65) 4003.36,2432.65 4003.36,2412.96 cw(c3925.12,2412.96) 3925.12,2334.72 3828.25,2334.72 3828.27,2334.72 3340.71,2333.7 3340.72,2333.71 2897.72,2333.71 ccw(c2897.27,2333.49) 2897.27,2333.99 1960.26,2333.99 cw(c1960.26,2412.23)
5V on L3-V (split plane): 3931.64,3888.15 3938.08,3887.06 3944.35,3885.25 3950.39,3882.75 3956.1,3879.59 3961.43,3875.82 3966.3,3871.46 3970.65,3866.59 3974.43,3861.27 3977.59,3855.55 3980.09,3849.52 3981.89,3843.25 3982.99,3836.81 3983.32,3830.86 3983.26,3830.29 3983.26,3810.6 3983.27,3810.52 3983.64,3801.26 3984.74,3791.98 3986.56,3782.82 3989.09,3773.82 3992.33,3765.06 3996.24,3756.57 4000.81,3748.42 4006,3740.65 4011.79,3733.31 4018.13,3726.44 4024.99,3720.1 4032.33,3714.32 4040.1,3709.12 4048.25,3704.56 4056.74,3700.65 4065.51,3697.41 4074.5,3694.87 4083.67,3693.05 4092.95,3691.95 4102.2,3691.59 4102.29,3691.58 4121.97,3691.58 4122.54,3691.64 4128.49,3691.3 4134.93,3690.21 4141.2,3688.4 4147.24,3685.9 4152.95,3682.74 4158.28,3678.96 4163.15,3674.61 4167.5,3669.74 4171.28,3664.42 4174.44,3658.7 4176.94,3652.67 4178.74,3646.39 4179.84,3639.96 4180.17,3634.01 4180.12,3633.44 4180.12,2750.09 3890.09,2750.09 3890.09,2820 3889.74,2822.61 3888.74,2825.04 3887.13,2827.13 3885.04,2828.74 3882.61,2829.74 3880,2830.09 3740,2830.09 3737.39,2829.74 3734.96,2828.74 3732.87,2827.13 3731.26,2825.04 3730.26,2822.61 3729.91,2820 3729.91,2710.09 3550.09,2710.09 3550.09,2899.91 3920,2899.91 3922.61,2900.26 3925.04,2901.26 3927.13,2902.87 3928.74,2904.96 3929.74,2907.39 3930.09,2910 3930.09,2969.91 3980,2969.91 3982.61,2970.26 3985.04,2971.26 3987.13,2972.87 3988.74,2974.96 3989.74,2977.39 3990.09,2980 3990.09,3420 3989.74,3422.61 3988.74,3425.04 3987.13,3427.13 3985.04,3428.74 3982.61,3429.74 3980,3430.09 3870.09,3430.09 3870.09,3640 3869.74,3642.61 3868.74,3645.04 3867.13,3647.13 3865.04,3648.74 3862.61,3649.74 3860,3650.09 3660,3650.09 3657.39,3649.74 3654.96,3648.74 3652.87,3647.13 3651.26,3645.04 3650.26,3642.61 3649.91,3640 3649.91,3550.09 3360,3550.09 3357.39,3549.74 3354.96,3548.74 3352.87,3547.13 3351.26,3545.04 3350.26,3542.61 3349.91,3540 3349.91,3420 3350.26,3417.39 3351.26,3414.96 3352.87,3412.87 3354.96,3411.26 3357.39,3410.26 3360,3409.91 3409.91,3409.91 3409.91,3290.09 3070.09,3290.09 3070.09,3887.93 3438.53,3888.43 3925.12,3888.43 3925.69,3888.49
3V3 on L3-V (split plane): 289 vertices, not listed, extent 1705.21,2353.8 4180.17,3887.9
GND on L2-G (split plane): 276 vertices, not listed, extent 1705.21,2353.8 4180.17,3888.49

## Keep-outs
Keep-Out Layer:
  lines w10: 2180,2820 2180,3420 2410,3420 2410,2820 2180,2820

## Other copper
Top Layer:
  region net GND: 3295.02,3420 3160,3420 3140,3440 3140,3560 3090.16,3609.84 2680.06,3609.84 2680.06,3190.16 3090.16,3190.16 3130,3230 3130,3360 3150,3380 3295.02,3380
  region net 5V: 3300,3353 3313,3366 3313,3393 3320,3400 3420,3400 3430,3390 3430,3310 3420,3300 3320,3300 3307,3313 3174.94,3313 3174.94,3353
  region net 3V3: 3174.94,3487 3307,3487 3330,3510 3330,3570 3372.5,3570 3375,3567.5 3375,3535 3430,3480 3430,3440 3420,3430 3320,3430 3303,3447 3174.94,3447
Bottom Layer:
  region net 5V: 3310,3405 3295,3390 3295,3347.5 3275,3327.5 3212.5,3327.5 3195,3310 3195,3263.66 3208.5,3250.16 3232.13,3250.16 3235,3253.03 3235,3285 3247.5,3297.5 3317.5,3297.5 3395,3375 3395,3395 3385,3405
  region net 3V3: 3245,3482.5 3322.5,3482.5 3345,3505 3400,3505 3410,3495 3410,3435 3400,3425 3302.5,3425 3275,3452.5 3245,3452.5
  region net GND: 3212.5,3427.5 3185,3455 3185,3490 3170,3505 3125,3505 3115,3495 3115,3365 3127.5,3352.5 3275,3352.5 3275,3427.5
L2-G (plane layer: these items are gaps in the copper):
  rectangle: 2180,2820 2410,3420
L3-V (plane layer: these items are gaps in the copper):
  rectangle: 2180,2820 2410,3420
  lines w20: 3060,3908.01 3060,3280 3420,3280 3420,3420 3360,3420 3360,3540 3660,3540 3660,3640 3860,3640 3860,3420 3980,3420 3980,2980 3920,2980 3920,2910 3540,2910 3540,2700 3740,2700 3740,2820 3880,2820 3880,2740 4200.21,2740

## Silkscreen, mask and mechanical layers (free items; w line width, h text height)
Top Overlay:
  text "SYNC0" at 3860.09,3695.07 h23
  text "L" at 2226.85,3639.51 h23
  text "H" at 2276.06,3639.51 h23
  text "H" at 2325.28,3639.51 h23
  text "L" at 2374.49,3639.51 h23
  text "L" at 2647.52,3639.51 h23
  text "H" at 2696.73,3639.51 h23
  text "H" at 2745.95,3639.51 h23
  text "L" at 2795.16,3639.51 h23
  text "L" at 3068.19,3639.51 h23
  text "H" at 3117.4,3639.51 h23
  text "H" at 3166.62,3639.51 h23
  text "L" at 3215.83,3639.51 h23
  text "L" at 3486.44,3639.04 h23
  text "H" at 3535.65,3639.04 h23
  text "H" at 3584.87,3639.04 h23
  text "L" at 3634.08,3639.04 h23
  text "CAN1L" at 3904,3524 h23
  text "3V3" at 3302.47,3504.72 h23
  text "3V3" at 3672.47,3501.76 h23 r90
  text "CAN1H" at 3904,3491.01 h23
  text "5V" at 3955.67,3442.6 h23 r90
  text "TB+" at 1963.81,3441.28 h23 r90
  text "G" at 3956,3394 h23 r90
  text "TB-" at 1963.81,3381.28 h23 r90
  text "G" at 3955.67,3344.17 h23 r90
  text "RB+" at 1963.81,3321.28 h23 r90
  text "5V" at 3959.54,3288.39 h23 r90
  text "5V" at 3336,3264 h23 r90
  text "RB-" at 1963.81,3251.28 h23 r90
  text "TX" at 3164,3164 h23
  text "RX" at 3213.15,2989.77 h23
  text "5V" at 3955.67,2925.6 h23 r90
  text "TA+" at 1963.81,2924.28 h23 r90
  text "G" at 3956,2877 h23 r90
  text "TA-" at 1963.81,2864.28 h23 r90
  text "G" at 3955.67,2827.17 h23 r90
  text "RA+" at 1963.81,2804.28 h23 r90
  text "CAN0L" at 3824,2804 h23
  text "SYNC1" at 2284,2774 h23
  text "5V" at 3959.54,2771.39 h23 r90
  text "RA-" at 1963.81,2734.28 h23 r90
  text "OSCVDD12" at 2537.65,2726.59 h23 r90
  text "NF" at 2646,2654 h23 r90
  text "FXSDB" at 2766,2624 h23 r90
  text "CAN0H" at 3806,2624 h23 r90
  text "L" at 2224,2584 h23
  text "H" at 2273.21,2584 h23
  text "H" at 2322.43,2584 h23
  text "L" at 2371.64,2584 h23
  text "L" at 2644.66,2584 h23
  text "H" at 2693.87,2584 h23
  text "H" at 2743.09,2584 h23
  text "L" at 2792.3,2584 h23
  text "L" at 3065.32,2584 h23
  text "H" at 3114.53,2584 h23
  text "H" at 3163.76,2584 h23
  text "L" at 3212.97,2584 h23
  text "L" at 3486,2584 h23
  text "H" at 3535.21,2584 h23
  text "H" at 3584.43,2584 h23
  text "L" at 3633.64,2584 h23
  text "RST2N" at 3714,2584 h23
  text "RSTN" at 2104,2574 h23
Bottom Overlay:
  text "GND" at 3963.37,3381.83 h23 r270
  text "CLK" at 3934.27,3296.44 h23 r270
  text "DIO" at 3934.27,3244.31 h23 r270
  text "LINK1" at 1949,3189 h23 r270
  text "RST2N" at 3934.98,3142.95 h23 r270
  text "TCK" at 1949,3119 h23 r270
  text "GND" at 2006,3074 h23
  text "VTREF" at 3944,3044 h23 r270
  text "3V3" at 2001,3029 h23
  text "GND" at 3946,2944 h23
  text "LINK0" at 3956,2914 h23
  text "LINK1" at 3956,2881.1 h23
  text "SDA" at 3956,2854 h23
  text "TCK" at 3956,2824 h23
Mechanical 1:
  drawing of 6825 lines, arcs and shapes, not listed
Mechanical 2:
  lines w0.5: 984.5,7519.94 3346.71,7519.94 3346.71,8071.12
OUTLINE:
  lines w8: 2897.27,2333.99 1960.26,2333.99 cw(c1960.26,2412.23) 1882.02,2412.23 1882.02,2431.92 ccw(c1783.09,2431.92) 1783.09,2530.84 1763.41,2530.84 cw(c1763.41,2609.08) 1685.17,2609.08 1685.17,3484.67 1685.17,3632.7 cw(c1763.41,3632.7) 1763.41,3710.94 1783.09,3710.94 ccw(c1783.09,3809.87) 1882.02,3809.87 1882.02,3829.55 cw(c1960.26,3829.55) 1960.26,3907.79 2897.27,3907.79 3438.51,3908.53 3925.12,3908.53 cw(c3925.12,3830.29) 4003.36,3830.29 4003.36,3810.6 ccw(c4102.29,3810.6) 4102.29,3711.68 4121.97,3711.68 cw(c4121.97,3633.44) 4200.21,3633.44 4200.21,2609.82 cw(c4121.97,2609.82) 4121.97,2531.57 4102.29,2531.58 ccw(c4102.29,2432.65) 4003.36,2432.65 4003.36,2412.96 cw(c3925.12,2412.96) 3925.12,2334.72 3828.25,2334.72 3340.71,2333.7 2897.71,2333.71
Mechanical 8:
  lines w0.5: 0.25,6102.61 984.5,6102.61 ; 984.5,194.77 11496.31,194.77 11496.31,8071.12 984.5,8071.12 984.5,197.1 ; 2303.4,0.25 2303.4,194.77 ; 2303.4,8071.12 2303.4,8267.97 ; 4271.9,0.25 4271.9,194.77 ; 4271.9,8071.12 4271.9,8267.97 ; 6240.41,0.25 6240.41,194.77 ; 6240.41,7874.27 6240.41,8267.97 ; 6529.81,194.77 6529.81,1738.08 11490.44,1738.08 ; 6529.81,392.26 8734.54,392.26 11490.44,392.26 ; 6529.81,580.6 8734.54,580.6 ; 6529.81,773.51 8734.54,773.51 ; 6529.81,966.42 8734.54,966.42 ; 6529.81,1159.34 8734.54,1159.34 ; 6529.81,1352.25 8734.54,1352.25 ; 6529.81,1545.17 8734.54,1545.17 ; 6805.4,966.42 6805.4,1738.08 ; 6860.52,194.77 6860.52,966.42 ; 7080.99,966.42 7080.99,1738.08 ; 7191.23,194.77 7191.23,966.42 ; 7521.94,966.42 7521.94,1738.08 ; 7632.17,194.77 7632.17,966.42 ; 7962.88,194.77 7962.88,1738.08 ; 8208.91,0.25 8208.91,194.77 ; 8208.91,8071.12 8208.91,8267.97 ; 8293.59,194.77 8293.59,1738.08 ; 8733.66,1739.52 8734.67,194.77 ; 8733.98,1243.45 11489.89,1243.45 ; 8734.54,718.39 11490.44,718.39 ; 8734.96,966.43 10076.44,966.43 ; 8913.67,718.39 8913.67,966.42 ; 9092.8,718.39 9092.8,966.42 ; 9271.94,718.39 9271.94,966.42 ; 9451.07,194.77 9451.07,392.26 ; 9451.07,720.3 9451.07,1243.92 ; 9781.78,718.39 9781.78,1242.02 ; 10076.44,194.77 10076.44,1738.08 ; 10177.42,0.25 10177.42,194.77 ; 10177.42,8071.12 10177.42,8267.97 ; 11299.46,4134.11 11693.16,4134.11 ; 11496.31,2165.6 11693.16,2165.6 ; 11496.31,6102.61 11693.16,6102.61 ; 0.25,0.25 11693.16,0.25 11693.16,8267.97 0.25,8267.97 0.25,0.25
  text "1" at 1176.76,8273.05 h25
  text "2" at 3312.59,8273.05 h25
  text "3" at 5281.09,8273.05 h25
  text "4" at 7249.59,8273.05 h25
  text "5" at 9218.1,8273.05 h25
  text "6" at 10960.32,8273.05 h25
  text "“图样代号”" at 2167.38,7766.78 h25 r180
  text "A" at 528.17,7288.8 h25
  text "A" at 11630.53,7288.8 h25
  text "B" at 11630.53,5221.87 h25
  text "C" at 11634.74,3253.36 h25
  text "材质 <未指定>" at 9554.04,1532.43 h25
  text "D" at 11615.16,1186.43 h25
  text "质量" at 9662.73,1141.4 h25
  text "阶 段 标 记" at 9186.87,1125.33 h25
  text "比例" at 9989.23,1125.33 h25
  text "处数" at 6998.19,1103.15 h25
  text "分区" at 7343.27,1103.15 h25
  text "更改文件号" at 7866.89,1103.15 h25
  text "签名" at 8166.4,1103.15 h25
  text "年 月 日" at 8579.87,1103.15 h25
  text "标记" at 6711.86,1087.08 h25
  text "“图样名称”" at 10833.57,1014.69 h25
  text "0.006" at 9660.1,929.15 h25
  text "1:1" at 9946.73,929.15 h25
  text "设计" at 6751.81,914.12 h25
  text "标准化" at 7864,896.22 h25
  text "校核" at 6751.81,724.54 h25
  text "工艺" at 7842.83,723.53 h25
  text "“图样代号”" at 10833.63,593.01 h25
  text "主管设计" at 6783.24,523.91 h25
  text "审核" at 7842.83,523.91 h25
  text "1" at 8886.65,350.71 h25
  text "1" at 9269.79,350.71 h25
  text "批准" at 7842.9,334.41 h25
  text "第  张" at 9324.77,327.21 h25
  text "版本" at 9623.24,318.57 h25
  text "替代" at 10161.2,318.57 h25
  text "共  张" at 8965.74,311.14 h25
  text "2" at 3312.59,202.18 h25
  text "3" at 5281.09,202.18 h25
  text "4" at 7249.59,202.18 h25
  text "5" at 9218.1,202.18 h25
  text "6" at 10960.32,202.18 h25